# Altium PCB Pcb_2layer_4x4_Template.PcbDoc
Units mil, origin at the board's own origin, x right, y up, seen from the top; angles counter-clockwise.
Board outline 1575 x 1375 mil, 2 copper layers (Top Layer, Bottom Layer); 13 components, 7 nets, 42 pads, 6 vias.
Unrouted connection lines stored in the file: 14.
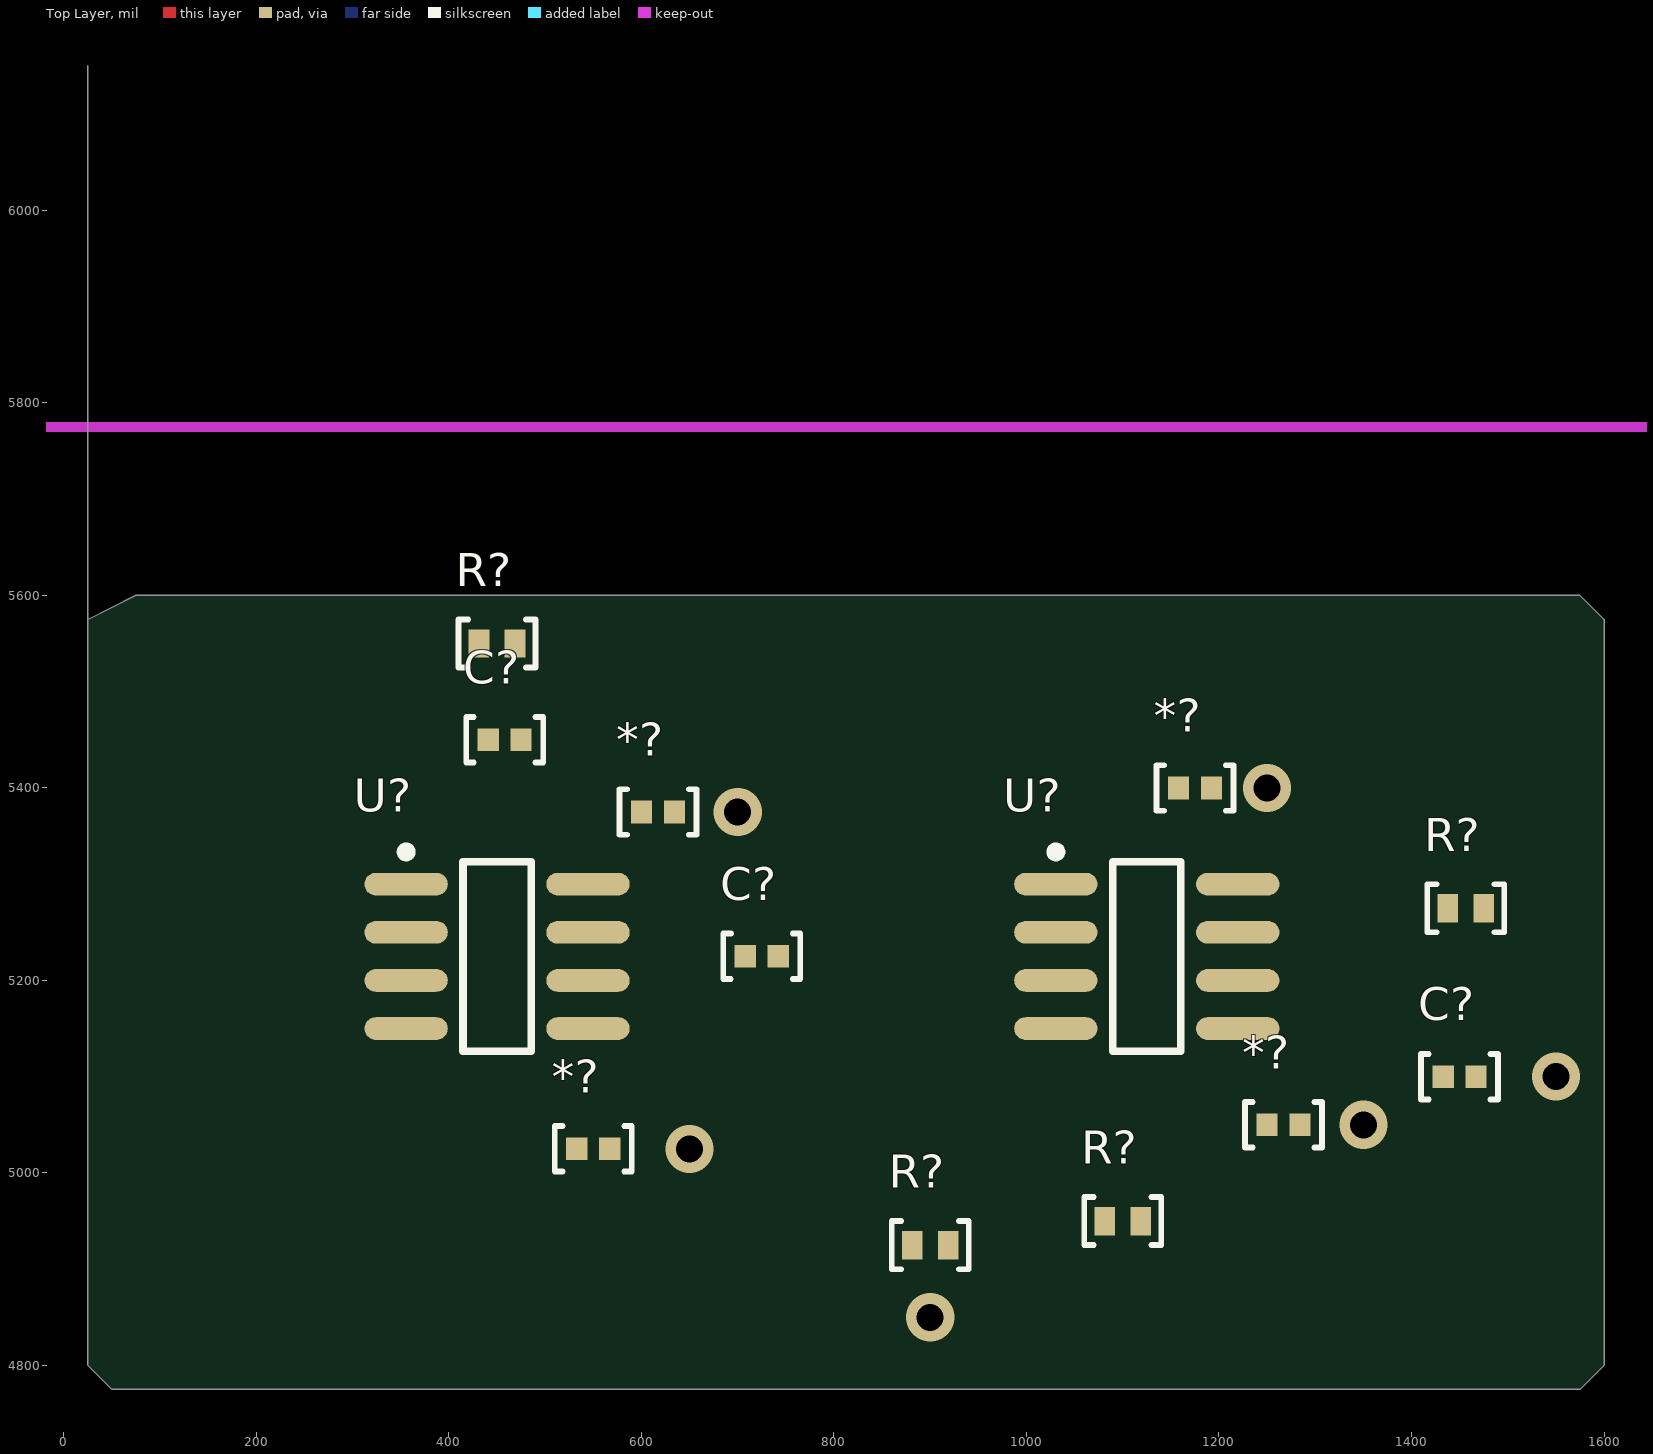
[diagram p0: Top Layer view]
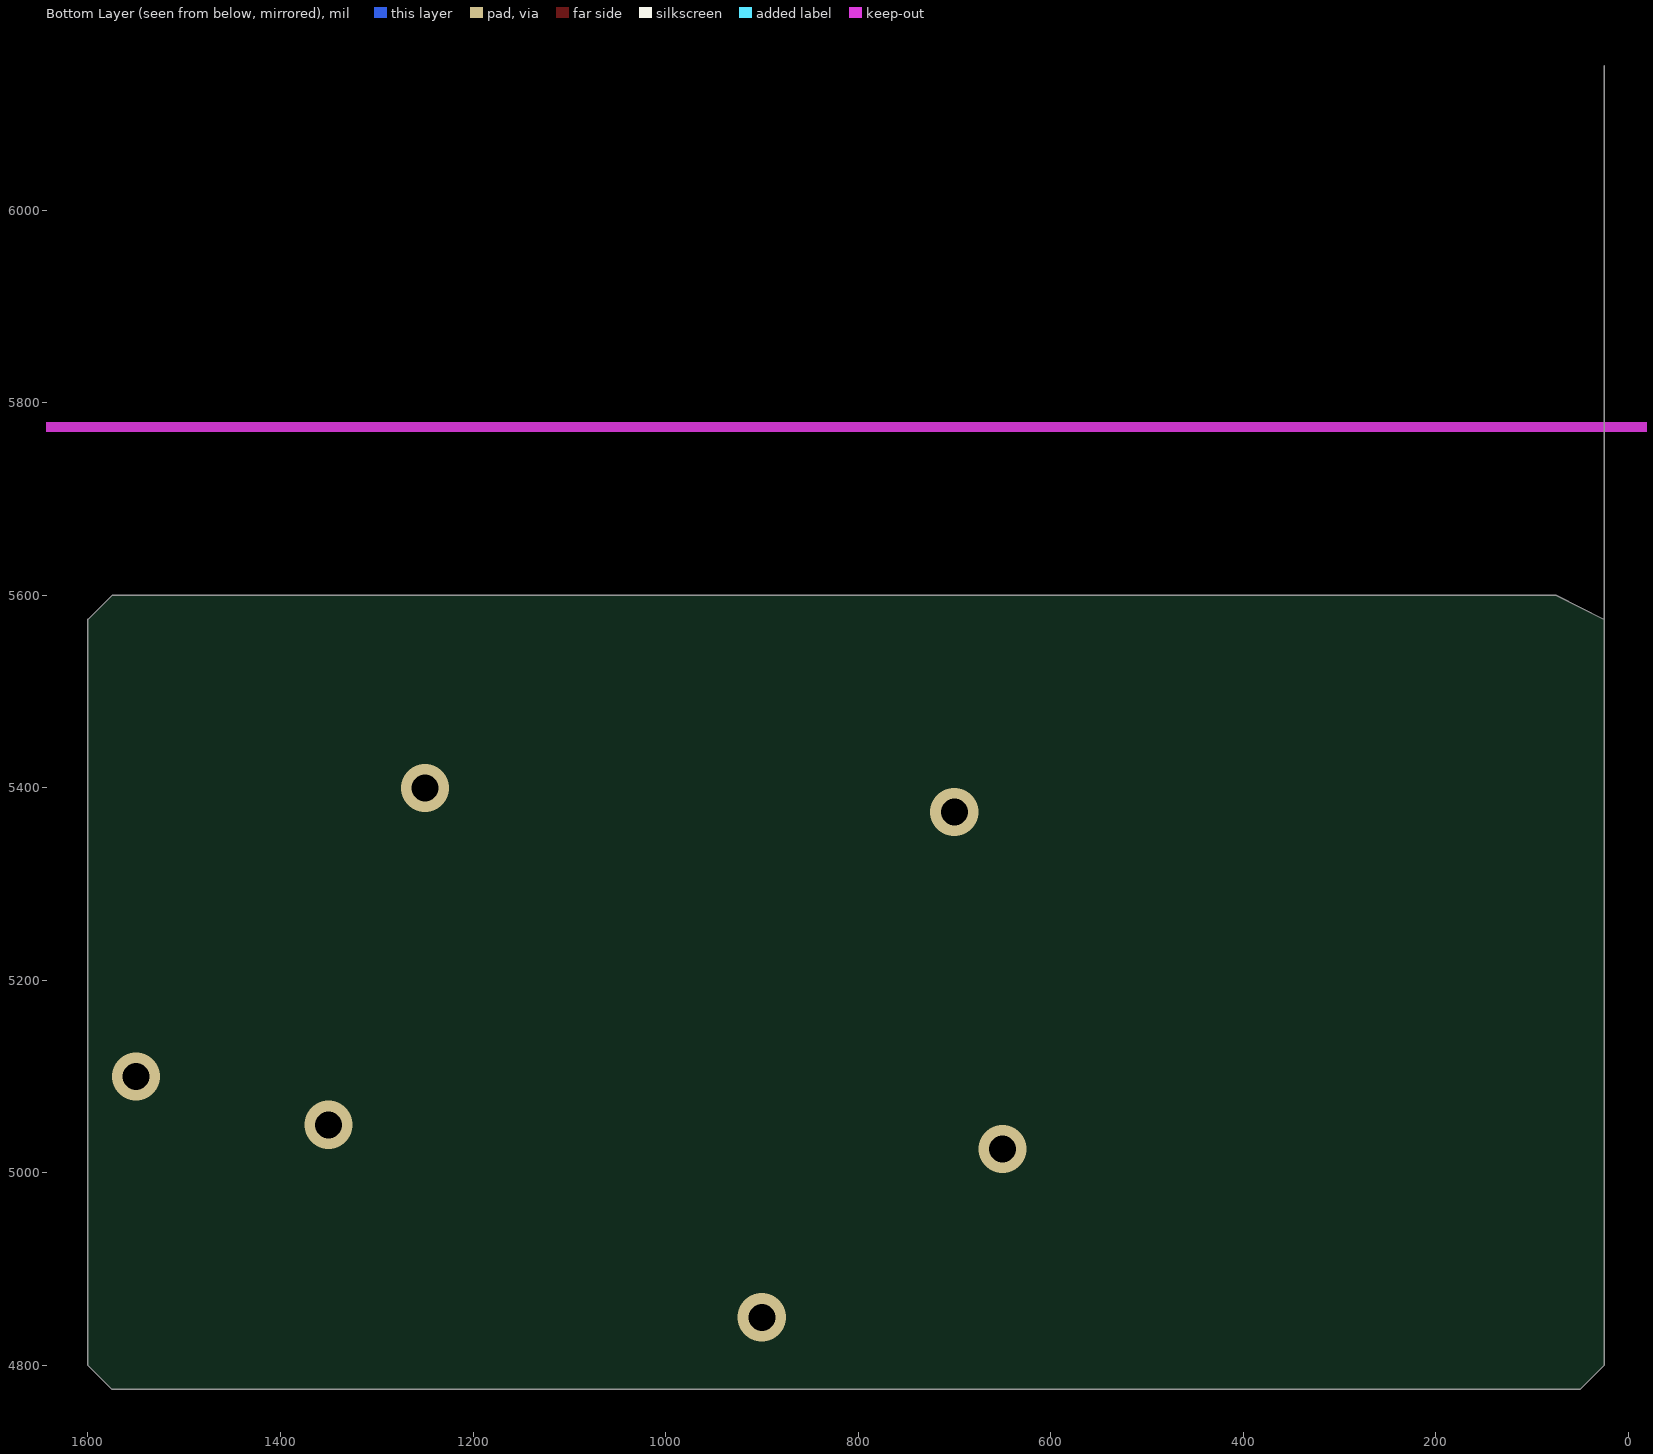
[diagram p1: Bottom Layer view, seen from below]

## Layer stack, top to bottom
Top Solder: solder mask 0.4, Solder Resist, Dk 3.5
Top Layer: signal copper 1.4
Dielectric 1: dielectric 12.6, FR-4, Dk 4.8
Bottom Layer: signal copper 1.4
Bottom Solder: solder mask 0.4, Solder Resist, Dk 3.5

## Board outline
75,5600 1575,5600 1600,5575 1600,4800 1575,4775 50,4775 25,4800 25,6150 25,5575

## Design rules (kind name [scope] priority, off if disabled: settings)
Clearance [All] p1: gap=10 ignorepadtopadclearanceinfootprint=FALSE except(0: Arc-Hole Track-Hole SMDPad-Hole THPad-Hole Via-Hole Fill-Hole Poly-Hole Region-Hole Text-Hole)
PolygonConnect [All] p1: connectstyle=Relief reliefconductorwidth=10 reliefentries=4 polygonreliefangle="90 Angle" airgapwidth=10
RoutingVias [All] p1: holewidth=28 width=50 viastyle="Through Hole" minholewidth=28 minwidth=50 maxholewidth=28 maxwidth=50
SolderMaskExpansion [All] p1: expansion=4 istentingtop=FALSE
SupplyNets "Schematic Supply Nets_2" [InNet('-5')] p1: voltage=0.000
SupplyNets "Schematic Supply Nets_1" [InNet('VCC')] p2: voltage=0.000
SupplyNets "Schematic Supply Nets" [InNet('GND')] p3: voltage=0.000
Width [All] p1: maxlimit=10 minlimit=10 preferedwidth=10
30 further rules are at their usual default settings.

## Classes and differential pairs
component class Charge_PREAMP_sch: *? C? R? U?

## Components (designator, comment, footprint, x,y, rotation, side; value= is the part's Value field where it differs from the comment)
*? "*CL05A104KA5NNNC" CAPACITOR_0402 617.13,5375 r0 top
*? "*CL05A104KA5NNNC" CAPACITOR_0402 550,5025 r0 top
*? "*CL05A104KA5NNNC" CAPACITOR_0402 1267.13,5050 r0 top
*? "*CL05A104KA5NNNC" CAPACITOR_0402 1175,5400 r0 top
C? "1uF Ceramic 16V" CAPACITOR_0402 1450,5100 r0 top value=1uF
C? "1uF Ceramic 16V" CAPACITOR_0402 725,5225 r0 top value=1uF
C? "1uF Ceramic 16V" CAPACITOR_0402 457.87,5450 r0 top value=1uF
R? "0 Ohm 1% 1/16W" RESISTOR_0402 450,5550 r0 top
R? "0 Ohm 1% 1/16W" RESISTOR_0402 1456.3,5275 r0 top
R? "0 Ohm 1% 1/16W" RESISTOR_0402 900,4925 r0 top
R? "0 Ohm 1% 1/16W" RESISTOR_0402 1100,4950 r0 top
U? "AD8682ARZ-REEL7" ADI-R-8_N 1125,5225 r0 top
U? "AD8682ARZ-REEL7" ADI-R-8_N 450,5225 r0 top

## Footprints (in the part's own frame and the unit in brackets; to place one, negate y for a bottom-side part, rotate by r counter-clockwise, add the part's x,y. Pads: shape width x height; smd on the part's side, far side on the other; paste and mask are expansions set on the pad)
ADI-R-8_N [mm] "SOIC, 8-Leads, Body 4.9x3.9mm, Pitch 1.27mm, IPC Medium Density"
  oval 2.2x0.6 smd: 1(-2.4,1.905) 2(-2.4,0.635) 3(-2.4,-0.635) 4(-2.4,-1.905) 5(2.4,-1.905) 6(2.4,-0.635) 7(2.4,0.635) 8(2.4,1.905)
  silkscreen extent -2.52,-2.5 0.9,2.88, body extent -2,-2.5 2,2.5, height 1.75
CAPACITOR_0402 [mm]
  rect 0.56x0.6 smd: 1(-0.435,0) 2(0.435,0)
  silkscreen extent -1.02,-0.6 1.02,0.6, body extent -0.5,-0.28 0.5,0.27, height 0.51
RESISTOR_0402 [mm] "Resistor 0402"
  rect 0.55x0.75 smd: 1(-0.475,0) 2(0.475,0)
  silkscreen extent -1.02,-0.64 1.02,0.64, body extent -0.5,-0.25 0.5,0.25, height 0.25

## Part data
*? *? *? *?: library part "CAP CER 0.1UF 25V X5R 0402", "0.1 µF ±10% 25V Ceramic Capacitor X5R 0402 (1005 Metric)", Capacitance=0.1uF, Rated Voltage=25V, Supplier Part Number 1=CL05A104KA5NNNC, Tolerance="+/- 10%", ComponentLink1Description="Data Sheet", ComponentLink1URL=https://mm.digikey.com/Volume0/opasdata/d220001/medias/docus/503/CL05A104KA5NNNC.pdf, Name="Zach Ramsey", Supplier 1="Arrow Electronics"
C? C? C?: library part CAPACITOR_1uF_0402, "Cap 1uF 16V +/-10% / Ceramic 0402", Supplier Part Number 1=478-0402YD105KAT4ADKR-ND, Tolerance="+/- 10%", Voltage=16V, Made By="Robert Pafford", Supplier 1=Digi-Key
R? R? R? R?: library part RESISTOR_0_0402, "RES 0 OHM 1% 1/16W 0402", Supplier Part Number 1=13-AC0402FR-070RLCT-ND, Tolerance="+/- 1%", Value  (Ohms)=0, Made By="Robert Pafford", Supplier 1=Digikey, Wattage=1/16W
U? U?: library part CMP-0384-01141-1, "Double Channel Low Supply Current Operational Amplifier, 3.5 MHz BW, 9V/us SR, Industrial, 8-pin SOIC (R-8), Reel", Amplifiers Per Package=2, Generic Part Number=AD8682, Input Bias Current=6pA, Input Offset Voltage=350uV, Manufacturer="Analog Devices", Code_JEDEC=MS-012-AA, ComponentLink1Description="Manufacturer URL", ComponentLink1URL=http://www.analog.com/en/index.html, ComponentLink2Description=Datasheet, ComponentLink2URL=http://www.analog.com/static/imported-files/data_sheets/AD8682_AD8684.pdf, ComponentLink3Description="Package Specification", ComponentLink3URL=http://www.analog.com/static/imported-files/packages/PKG_PDF/SOIC_Narrow%20(R)/R_8.pdf, DatasheetVersion="Rev. B", Iq/Amp=250uA, Mounting Technology="Surface Mount", PackageDescription="8-Pin Standard Small Outline Package, Body 3.9 x 4.9 mm, Pitch 1.27 mm", PackageReference=R-8, PackageVersion=060506-A, PartNumber=AD8682ARZ-REEL7, Slew Rate=9V/us, Small Signal Bandwidth=3.5MHz, V Span Max=32V, V Span Min=9V

## Free pads (board coordinates)
  round 60 hole 165: 1(-100,2025) 1(-100,5525) 1(3400,2025) 1(3400,5525)

## Via types
v1: diameter 50, hole 28, Top Layer to Bottom Layer, 6 vias

## Nets (pads, with @x,y where several pads share a name; then routed paths per layer and width w, separated by ;. In a path a pad name is that pad's centre, name@x,y a point inside that pad or via, vN(x,y) a via of type N, cw(c..) or ccw(c..) an arc to the next point about the centre after c; other vN are vias at no path point)
-5: U?.4
GND: *?.1 C?.1@440.75,5450 R?.1@431.3,5550 U?.2@1030.51,5250
NetC?_1: C?.1@1432.87,5100 U?.3@355.51,5200
NetC?_2: C?.2@475,5450 R?.1@881.3,4925
NetR?_1: R?.1@1437.6,5275 R?.2@918.7,4925 U?.1@355.51,5300
NetR?_2: R?.2@468.7,5550 R?.2@1475,5275 U?.2@355.51,5250
VCC: U?.8
pads on no net: *?.2 C?.1@707.87,5225 C?.2@742.13,5225 C?.2@1467.13,5100 R?.1@1081.3,4950 R?.2@1118.7,4950 U?.1@1030.51,5300 U?.3@1030.51,5200 U?.5 U?.6 U?.7
copper on no net:
  other v1: 900,4850 650,5025 1350,5050 1550,5100 700,5375 1250,5400

## Keep-outs
Keep-Out Layer:
  lines w10: -350,2025 ccw(c-100,2025) -100,1775 775,1775 2525,1775 3400,1775 ccw(c3400,2025) 3650,2025 3650,5525 ccw(c3400,5525) 3400,5775 -100,5775 ccw(c-100,5525) -350,5525 -350,2025

## Silkscreen, mask and mechanical layers (free items; w line width, h text height)
Top Overlay:
  drawing of 19 lines, arcs and shapes, not listed
  text "The Underwater Robotics Team" at 1135,2035 h60
  text "'.ProjectTitle'" at 1135,1929.99 h60